# Altium PCB 24V-10A-Power-Board-v1.0.PcbDoc (part 5 of 5)
Units mil, origin at the board's own origin, x right, y up, seen from the top; angles counter-clockwise.
Board outline 6000 x 4000 mil, 2 copper layers (Top Layer, Bottom Layer); 609 components, 307 nets, 1491 pads, 0 vias.
Unrouted connection lines stored in the file: 1132.
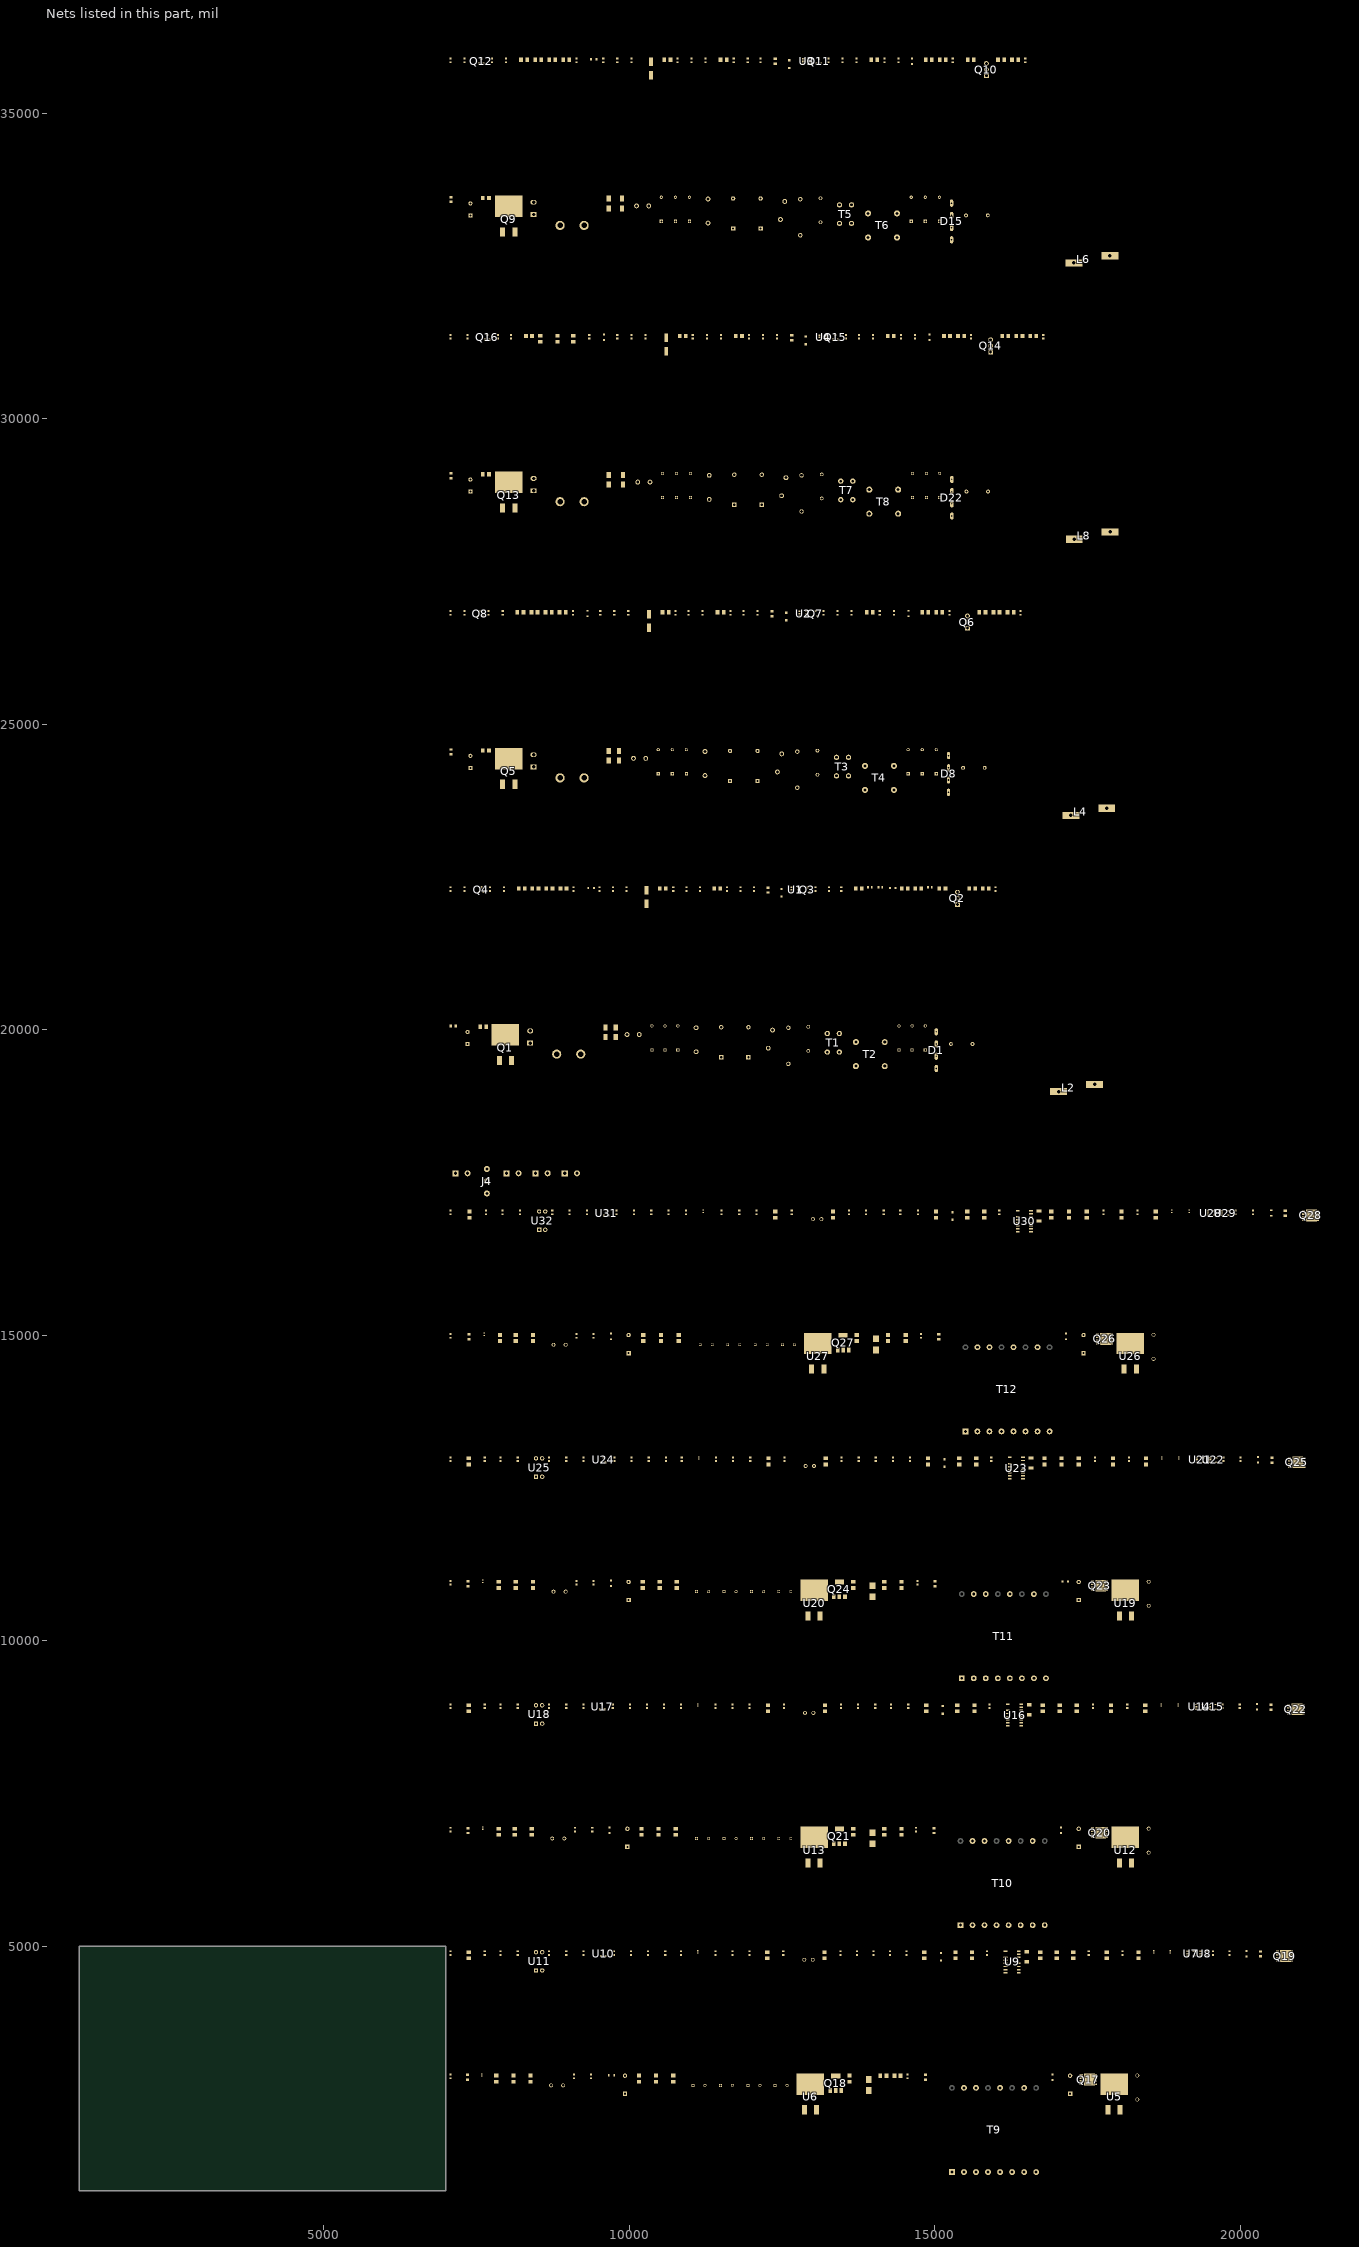
[diagram p2: the nets of this part, all layers, seen from the top]

## Nets (pads, with @x,y where several pads share a name; then routed paths per layer and width w, separated by ;. In a path a pad name is that pad's centre, name@x,y a point inside that pad or via, vN(x,y) a via of type N, cw(c..) or ccw(c..) an arc to the next point about the centre after c; other vN are vias at no path point) (continued)
24VDC-C2: C128.2 C130.1 C131.1 C132.1 C133.1 C134.1 C135.1 C136.2 C142.2 C143.2 C145.2 C147.2 J2.1 R162.2 T10.3 T10.4 T10.5 T10.6 U14.4 U15.4
24VDC-C3: C163.2 C165.1 C166.1 C167.1 C168.1 C169.1 C170.1 C171.2 C177.2 C178.2 C180.2 C182.2 J3.1 R192.2 T11.3 T11.4 T11.5 T11.6 U21.4 U22.4
24VDC-C4: C198.2 C200.1 C201.1 C202.1 C203.1 C204.1 C205.1 C206.2 C212.2 C213.2 C215.2 C217.2 J5.1 R222.2 T12.3 T12.4 T12.5 T12.6 U28.4 U29.4
AC_L: F1.1 F2.1 F3.1 F4.1 J4.1
AC_N: C1.2 C6.2 C24.2 C29.2 C47.2 C52.2 C70.2 C75.2 J4.3 T1.1 T3.1 T5.1 T7.1 VR1.2 VR2.2 VR3.2 VR4.2
BLK-C1: C125.2 R124.1 R128.2 U9.4
BLK-C2: C160.2 R154.1 R158.2 U16.4
BLK-C3: C195.2 R184.1 R188.2 U23.4
BLK-C4: C230.2 R214.1 R218.2 U30.4
BW-C1: C123.2 R108.1 R112.2 U9.8
BW-C2: C158.2 R138.1 R142.2 U16.8
BW-C3: C193.2 R168.1 R172.2 U23.8
BW-C4: C228.2 R198.1 R202.2 U30.8
DRV-C1: R5.1 R8.1 U1.5
DRV-C2: R31.1 R34.1 U2.5
DRV-C3: R83.1 R86.1 U4.5
DRV-C4: R57.1 R60.1 U3.5
EARTH: C1.1 C2.1 C3.1 C9.2 C10.2 C11.2 C24.1 C25.1 C26.1 C32.2 C33.2 C34.2 C47.1 C48.1 C49.1 C55.2 C56.2 C57.2 C70.1 C71.1 C72.1 C78.2 C79.2 C80.2 J4.2
FB-C1: C127.1 U9.5 U11.4
FB-C2: C162.1 U16.5 U18.4
FB-C3: C197.1 U23.5 U25.4
FB-C4: C232.1 U30.5 U32.4
GND: C4.1 C5.1 C13.1 C18.1 C20.1 C21.2 C22.1 C23.2 C27.1 C28.1 C36.1 C41.1 C43.1 C44.2 C45.1 C46.2 C50.1 C51.1 C59.1 C64.1 C66.1 C67.2 C68.1 C69.2 C73.1 C74.1 C82.1 C87.1 C89.1 C90.2 C91.1 C92.2 C93.1 C102.2 C105.2 C106.1 C114.1 C115.1 C116.1 C117.1 C118.2 C119.1 C120.2 C121.1 C122.1 C123.1 C124.1 C125.1 C127.2 C128.1 C137.2 C140.2 C141.1 C149.1 C150.1 C151.1 C152.1 C153.2 C154.1 C155.2 C156.1 C157.1 C158.1 C159.1 C160.1 C162.2 C163.1 C172.2 C175.2 C176.1 C184.1 C185.1 C186.1 C187.1 C188.2 C189.1 C190.2 C191.1 C192.1 C193.1 C194.1 C195.1 C197.2 C198.1 C207.2 C210.2 C211.1 C219.1 C220.1 C221.1 C222.1 C223.2 C224.1 C225.2 C226.1 C227.1 C228.1 C229.1 C230.1 C232.2 D1.4 D7.2 D8.4 D14.2 D15.4 D21.2 D22.4 D28.2 D32.2 D38.2 D44.2 D50.2 Q1.3 Q4.2 Q5.3 Q8.2 Q9.3 Q12.2 Q13.3 Q16.2 R2.1 R17.1 R18.1 R20.1 R21.2 R22.2 R23.1 R24.1 R26.1 R28.1 R43.1 R44.1 R46.1 R47.2 R48.2 R49.1 R50.1 R52.1 R54.1 R69.1 R70.1 R72.1 R73.2 R74.2 R75.1 R76.1 R78.1 R80.1 R95.1 R96.1 R98.1 R99.2 R100.2 R101.1 R102.1 R104.1 R111.2 R112.1 R125.1 R126.1 R128.1 R129.1 R141.2 R142.1 R155.1 R156.1 R158.1 R159.1 R171.2 R172.1 R185.1 R186.1 R188.1 R189.1 R201.2 R202.1 R215.1 R216.1 R218.1 R219.1 RT1.1 RT2.1 RT3.1 RT4.1 T9.14 T10.14 T11.14 T12.14 U1.4 U2.4 U3.4 U4.4 U6.3 U9.11 U13.3 U16.11 U20.3 U23.11 U27.3 U30.11
H_V-C1: C12.1 C94.1 D4.1 R1.2 R121.2 U5.2
H_V-C2: C35.1 C129.1 D11.1 R27.2 R151.2 U12.2
H_V-C3: C81.1 C164.1 D25.1 R79.2 R181.2 U19.2
H_V-C4: C58.1 C199.1 D18.1 R53.2 R211.2 U26.2
HB-C1: C113.1 D33.1 U9.14
HB-C2: C148.1 D39.1 U16.14
HB-C3: C183.1 D45.1 U23.14
HB-C4: C218.1 D51.1 U30.14
HO-C1: D29.1 R105.1 U9.15
HO-C2: D35.1 R135.1 U16.15
HO-C3: D41.1 R165.1 U23.15
HO-C4: D47.1 R195.1 U30.15
HS-C1: C113.2 R106.2 T9.12 U5.3 U6.2 U9.16
HS-C2: C148.2 R136.2 T10.12 U12.3 U13.2 U16.16
HS-C3: C183.2 R166.2 T11.12 U19.3 U20.2 U23.16
HS-C4: C218.2 R196.2 T12.12 U26.3 U27.2 U30.16
HV_S-C1: D2.1 D3.1 R117.1
HV_S-C2: D9.1 D10.1 R147.1
HV_S-C3: D23.1 D24.1 R177.1
HV_S-C4: D16.1 D17.1 R207.1
ISNS-C1: C103.1 C121.2 R125.2 U9.6
ISNS-C2: C138.1 C156.2 R155.2 U16.6
ISNS-C3: C173.1 C191.2 R185.2 U23.6
ISNS-C4: C208.1 C226.2 R215.2 U30.6
LO-C1: D31.1 R110.1 U9.10
LO-C2: D37.1 R140.1 U16.10
LO-C3: D43.1 R170.1 U23.10
LO-C4: D49.1 R200.1 U30.10
NetC2_2: C2.2 C7.2 T1.4 T2.1
NetC3_2: C3.2 C8.2 D1.2 D3.2 T2.4
NetC4_2: C4.2 D1.1 L1.1
NetC5_2: C5.2 L1.2 L2.1
NetC6_1: C6.1 C11.1 F1.2 T1.2 VR1.1
NetC7_1: C7.1 C9.1 T1.3 T2.2
NetC8_1: C8.1 C10.1 D1.3 D2.2 T2.3
NetC12_2: C12.2 Q1.2 RT1.2
NetC13_2: C13.2 Q1.1 Q3.3 R2.2
NetC14_1: C14.1 C15.2 C16.2 R10.1 R13.1 R15.2
NetC15_1: C15.1 C16.1 Q2.3 R9.2 R15.1 R21.1 R22.1 R23.2 R24.2
NetC17_1: C17.1 D7.1 R19.2
NetC18_2: C18.2 C19.2 U1.6
NetC19_1: C19.1 R20.2
NetC20_2: C20.2 R14.2 U1.3
NetC21_1: C21.1 D6.2 R14.1
NetC22_2: C22.2 R11.1 R12.1 R17.2 R18.2 U1.1
NetC25_2: C25.2 C30.2 T3.4 T4.1
NetC26_2: C26.2 C31.2 D8.2 D10.2 T4.4
NetC27_2: C27.2 D8.1 L3.1
NetC28_2: C28.2 L3.2 L4.1
NetC29_1: C29.1 C34.1 F2.2 T3.2 VR2.1
NetC30_1: C30.1 C32.1 T3.3 T4.2
NetC31_1: C31.1 C33.1 D8.3 D9.2 T4.3
NetC35_2: C35.2 Q5.2 RT2.2
NetC36_2: C36.2 Q5.1 Q7.3 R28.2
NetC37_1: C37.1 C38.2 C39.2 R36.1 R39.1 R41.2
NetC38_1: C38.1 C39.1 Q6.3 R35.2 R41.1 R47.1 R48.1 R49.2 R50.2
NetC40_1: C40.1 D14.1 R45.2
NetC41_2: C41.2 C42.2 U2.6
NetC42_1: C42.1 R46.2
NetC43_2: C43.2 R40.2 U2.3
NetC44_1: C44.1 D13.2 R40.1
NetC45_2: C45.2 R37.1 R38.1 R43.2 R44.2 U2.1
NetC48_2: C48.2 C53.2 T5.4 T6.1
NetC49_2: C49.2 C54.1 C54.2 C56.1 D15.2 D15.3 D16.2 D17.2 T6.3 T6.4
NetC50_2: C50.2 D15.1 L5.1
NetC51_2: C51.2 L5.2 L6.1
NetC52_1: C52.1 C57.1 F3.2 T5.2 VR3.1
NetC53_1: C53.1 C55.1 T5.3 T6.2
NetC58_2: C58.2 Q9.2 RT3.2
NetC59_2: C59.2 Q9.1 Q11.3 R54.2
NetC60_1: C60.1 C61.2 C62.2 R62.1 R65.1 R67.2
NetC61_1: C61.1 C62.1 Q10.3 R61.2 R67.1 R73.1 R74.1 R75.2 R76.2
NetC63_1: C63.1 D21.1 R71.2
NetC64_2: C64.2 C65.2 U3.6
NetC65_1: C65.1 R72.2
NetC66_2: C66.2 R66.2 U3.3
NetC67_1: C67.1 D20.2 R66.1
NetC68_2: C68.2 R63.1 R64.1 R69.2 R70.2 U3.1
NetC71_2: C71.2 C76.2 T7.4 T8.1
NetC72_2: C72.2 C77.2 D22.2 D24.2 T8.4
NetC73_2: C73.2 D22.1 L7.1
NetC74_2: C74.2 L7.2 L8.1
NetC75_1: C75.1 C80.1 F4.2 T7.2 VR4.1
NetC76_1: C76.1 C78.1 T7.3 T8.2
NetC77_1: C77.1 C79.1 D22.3 D23.2 T8.3
NetC81_2: C81.2 Q13.2 RT4.2
NetC82_2: C82.2 Q13.1 Q15.3 R80.2
NetC83_1: C83.1 C84.2 C85.2 R88.1 R91.1 R93.2
NetC84_1: C84.1 C85.1 Q14.3 R87.2 R93.1 R99.1 R100.1 R101.2 R102.2
NetC86_1: C86.1 D28.1 R97.2
NetC87_2: C87.2 C88.2 U4.6
NetC88_1: C88.1 R98.2
NetC89_2: C89.2 R92.2 U4.3
NetC90_1: C90.1 D27.2 R92.1
NetC91_2: C91.2 R89.1 R90.1 R95.2 R96.2 U4.1
NetC94_2: C94.2 C102.1 C103.2 C104.2 T9.10
NetC105_1: C105.1 C106.2 Q18.2 Q18.4 R107.1 R109.2
NetC109_2: C109.2 U7.3
NetC111_2: C111.2 U8.3
NetC118_1: C118.1 C120.1 D34.2 U9.3
NetC124_2: C124.2 R123.1 R126.2 U9.9
NetC126_1: C126.1 R133.2 U10.2 U11.2
NetC126_2: C126.2 R130.1
NetC129_2: C129.2 C137.1 C138.2 C139.2 T10.10
NetC140_1: C140.1 C141.2 Q21.2 Q21.4 R137.1 R139.2
NetC144_2: C144.2 U14.3
NetC146_2: C146.2 U15.3
NetC153_1: C153.1 C155.1 D40.2 U16.3
NetC159_2: C159.2 R153.1 R156.2 U16.9
NetC161_1: C161.1 R163.2 U17.2 U18.2
NetC161_2: C161.2 R160.1
NetC164_2: C164.2 C172.1 C173.2 C174.2 T11.10
NetC175_1: C175.1 C176.2 Q24.2 Q24.4 R167.1 R169.2
NetC179_2: C179.2 U21.3
NetC181_2: C181.2 U22.3
NetC188_1: C188.1 C190.1 D46.2 U23.3
NetC194_2: C194.2 R183.1 R186.2 U23.9
NetC196_1: C196.1 R193.2 U24.2 U25.2
NetC196_2: C196.2 R190.1
NetC199_2: C199.2 C207.1 C208.2 C209.2 T12.10
NetC210_1: C210.1 C211.2 Q27.2 Q27.4 R197.1 R199.2
NetC214_2: C214.2 U28.3
NetC216_2: C216.2 U29.3
NetC223_1: C223.1 C225.1 D52.2 U30.3
NetC229_2: C229.2 R213.1 R216.2 U30.9
NetC231_1: C231.1 R223.2 U31.2 U32.2
NetC231_2: C231.2 R220.1
NetD5_1: D5.1 R8.2
NetD5_2: D5.2 Q2.1 R5.2 R9.1
NetD12_1: D12.1 R34.2
NetD12_2: D12.2 Q6.1 R31.2 R35.1
NetD19_1: D19.1 R60.2
NetD19_2: D19.2 Q10.1 R57.2 R61.1
NetD26_1: D26.1 R86.2
NetD26_2: D26.2 Q14.1 R83.2 R87.1
NetD29_2: D29.2 R105.2 R106.1 U5.1
NetD30_1: D30.1 R108.2 T9.15
NetD30_2: D30.2 R107.2
NetD31_2: D31.2 R110.2 R111.1 U6.1
NetD32_1: D32.1 Q18.1 R109.1
NetD33_2: D33.2 R120.2
NetD35_2: D35.2 R135.2 R136.1 U12.1
NetD36_1: D36.1 R138.2 T10.15
NetD36_2: D36.2 R137.2
NetD37_2: D37.2 R140.2 R141.1 U13.1
NetD38_1: D38.1 Q21.1 R139.1
NetD39_2: D39.2 R150.2
NetD41_2: D41.2 R165.2 R166.1 U19.1
NetD42_1: D42.1 R168.2 T11.15
NetD42_2: D42.2 R167.2
NetD43_2: D43.2 R170.2 R171.1 U20.1
NetD44_1: D44.1 Q24.1 R169.1
NetD45_2: D45.2 R180.2
NetD47_2: D47.2 R195.2 R196.1 U26.1
NetD48_1: D48.1 R198.2 T12.15
NetD48_2: D48.2 R197.2
NetD49_2: D49.2 R200.2 R201.1 U27.1
NetD50_1: D50.1 Q27.1 R199.1
NetD51_2: D51.2 R210.2
NetQ3_1: Q3.1 Q4.3 R16.1
NetQ4_1: Q4.1 R19.1 R25.2 R26.2
NetQ7_1: Q7.1 Q8.3 R42.1
NetQ8_1: Q8.1 R45.1 R51.2 R52.2
NetQ11_1: Q11.1 Q12.3 R68.1
NetQ12_1: Q12.1 R71.1 R77.2 R78.2
NetQ15_1: Q15.1 Q16.3 R94.1
NetQ16_1: Q16.1 R97.1 R103.2 R104.2
NetR1_1: R1.1 R3.2
NetR3_1: R3.1 R6.2
NetR4_1: R4.1 R7.2
NetR6_1: R6.1 R11.2 R12.2
NetR7_1: R7.1 R10.2
NetR27_1: R27.1 R29.2
NetR29_1: R29.1 R32.2
NetR30_1: R30.1 R33.2
NetR32_1: R32.1 R37.2 R38.2
NetR33_1: R33.1 R36.2
NetR53_1: R53.1 R55.2
NetR55_1: R55.1 R58.2
NetR56_1: R56.1 R59.2
NetR58_1: R58.1 R63.2 R64.2
NetR59_1: R59.1 R62.2
NetR79_1: R79.1 R81.2
NetR81_1: R81.1 R84.2
NetR82_1: R82.1 R85.2
NetR84_1: R84.1 R89.2 R90.2
NetR85_1: R85.1 R88.2
NetR113_2: R113.2 U7.5
NetR114_2: R114.2 U8.5
NetR115_2: R115.2 U7.1
NetR116_2: R116.2 U8.1
NetR117_2: R117.2 R118.1
NetR118_2: R118.2 R119.1
NetR119_2: R119.2 U9.1
NetR121_1: R121.1 R122.2
NetR122_1: R122.1 R124.2
NetR127_1: R127.1 R130.2 R131.1 U10.1
NetR129_2: R129.2 U11.3
NetR131_2: R131.2 R132.1 R133.1 R134.2
NetR134_1: R134.1 U11.1
NetR143_2: R143.2 U14.5
NetR144_2: R144.2 U15.5
NetR145_2: R145.2 U14.1
NetR146_2: R146.2 U15.1
NetR147_2: R147.2 R148.1
NetR148_2: R148.2 R149.1
NetR149_2: R149.2 U16.1
NetR151_1: R151.1 R152.2
NetR152_1: R152.1 R154.2
NetR157_1: R157.1 R160.2 R161.1 U17.1
NetR159_2: R159.2 U18.3
NetR161_2: R161.2 R162.1 R163.1 R164.2
NetR164_1: R164.1 U18.1
NetR173_2: R173.2 U21.5
NetR174_2: R174.2 U22.5
NetR175_2: R175.2 U21.1
NetR176_2: R176.2 U22.1
NetR177_2: R177.2 R178.1
NetR178_2: R178.2 R179.1
NetR179_2: R179.2 U23.1
NetR181_1: R181.1 R182.2
NetR182_1: R182.1 R184.2
NetR187_1: R187.1 R190.2 R191.1 U24.1
NetR189_2: R189.2 U25.3
NetR191_2: R191.2 R192.1 R193.1 R194.2
NetR194_1: R194.1 U25.1
NetR203_2: R203.2 U28.5
NetR204_2: R204.2 U29.5
NetR205_2: R205.2 U28.1
NetR206_2: R206.2 U29.1
NetR207_2: R207.2 R208.1
NetR208_2: R208.2 R209.1
NetR209_2: R209.2 U30.1
NetR211_1: R211.1 R212.2
NetR212_1: R212.1 R214.2
NetR217_1: R217.1 R220.2 R221.1 U31.1
NetR219_2: R219.2 U32.3
NetR221_2: R221.2 R222.1 R223.1 R224.2
NetR224_1: R224.1 U32.1
PGND-C1: C101.1 J1.2 NT1.2 R127.2 U10.3
PGND-C2: C136.1 J2.2 NT2.2 R157.2 U17.3
PGND-C3: C171.1 J3.2 NT3.2 R187.2 U24.3
PGND-C4: C206.1 J5.2 NT4.2 R217.2 U31.3
RVCC-C1: C17.2 C114.2 C115.2 C116.2 C117.2 D6.1 Q3.2 R16.2 R120.1 R123.2 U9.12
RVCC-C2: C40.2 C149.2 C150.2 C151.2 C152.2 D13.1 Q7.2 R42.2 R150.1 R153.2 U16.12
RVCC-C3: C86.2 C184.2 C185.2 C186.2 C187.2 D27.1 Q15.2 R94.2 R180.1 R183.2 U23.12
RVCC-C4: C63.2 C219.2 C220.2 C221.2 C222.2 D20.1 Q11.2 R68.2 R210.1 R213.2 U30.12
SGND-C1: C95.2 C96.2 C97.2 C98.2 C99.2 C100.2 C107.1 C108.1 C109.1 C110.1 C111.1 C112.1 NT1.1 Q17.1 Q17.2 Q17.3 Q19.1 Q19.2 Q19.3 U7.2 U8.2
SGND-C2: C130.2 C131.2 C132.2 C133.2 C134.2 C135.2 C142.1 C143.1 C144.1 C145.1 C146.1 C147.1 NT2.1 Q20.1 Q20.2 Q20.3 Q22.1 Q22.2 Q22.3 U14.2 U15.2
SGND-C3: C165.2 C166.2 C167.2 C168.2 C169.2 C170.2 C177.1 C178.1 C179.1 C180.1 C181.1 C182.1 NT3.1 Q23.1 Q23.2 Q23.3 Q25.1 Q25.2 Q25.3 U21.2 U22.2
SGND-C4: C200.2 C201.2 C202.2 C203.2 C204.2 C205.2 C212.1 C213.1 C214.1 C215.1 C216.1 C217.1 NT4.1 Q26.1 Q26.2 Q26.3 Q28.1 Q28.2 Q28.3 U28.2 U29.2
VCC-C1: C119.2 D34.1 Q18.3 R25.1
VCC-C2: C154.2 D40.1 Q21.3 R51.1
VCC-C3: C189.2 D46.1 Q24.3 R103.1
VCC-C4: C224.2 D52.1 Q27.3 R77.1
VCR-C1: C104.1 C122.2 U9.7
VCR-C2: C139.1 C157.2 U16.7
VCR-C3: C174.1 C192.2 U23.7
VCR-C4: C209.1 C227.2 U30.7
VD-C1: C14.2 D4.2 L2.2 Q2.2 R4.2
VD-C2: C37.2 D11.2 L4.2 Q6.2 R30.2
VD-C3: C83.2 D25.2 L8.2 Q14.2 R82.2
VD-C4: C60.2 D18.2 L6.2 Q10.2 R56.2
VD_R1-C1: Q19.5 Q19.6 Q19.7 Q19.8 R113.1 T9.7 T9.8
VD_R1-C2: Q22.5 Q22.6 Q22.7 Q22.8 R143.1 T10.7 T10.8
VD_R1-C3: Q25.5 Q25.6 Q25.7 Q25.8 R173.1 T11.7 T11.8
VD_R1-C4: Q28.5 Q28.6 Q28.7 Q28.8 R203.1 T12.7 T12.8
VD_R2-C1: Q17.5 Q17.6 Q17.7 Q17.8 R114.1 T9.1 T9.2
VD_R2-C2: Q20.5 Q20.6 Q20.7 Q20.8 R144.1 T10.1 T10.2
VD_R2-C3: Q23.5 Q23.6 Q23.7 Q23.8 R174.1 T11.1 T11.2
VD_R2-C4: Q26.5 Q26.6 Q26.7 Q26.8 R204.1 T12.1 T12.2
VG_R1-C1: Q19.4 R115.1
VG_R1-C2: Q22.4 R145.1
VG_R1-C3: Q25.4 R175.1
VG_R1-C4: Q28.4 R205.1
VG_R2-C1: Q17.4 R116.1
VG_R2-C2: Q20.4 R146.1
VG_R2-C3: Q23.4 R176.1
VG_R2-C4: Q26.4 R206.1
ZCD/CS-C1: C23.1 R13.2 U1.2
ZCD/CS-C2: C46.1 R39.2 U2.2
ZCD/CS-C3: C92.1 R91.2 U4.2
ZCD/CS-C4: C69.1 R65.2 U3.2
pads on no net: L2.M1 L4.M1 L6.M1 L8.M1 T9.9 T9.11 T9.13 T9.16 T10.9 T10.11 T10.13 T10.16 T11.9 T11.11 T11.13 T11.16 T12.9 T12.11 T12.13 T12.16

## Text inside footprints (layer, text, board x,y; h text height)
D1: Top Overlay "-" at 15117.86,20000 h52.3 r270; Top Overlay "+" at 15129.29,19384 h52.3 r270
D8: Top Overlay "-" at 15317.86,24520 h52.3 r270; Top Overlay "+" at 15329.29,23904 h52.3 r270
D15: Top Overlay "-" at 15367.86,33560 h52.3 r270; Top Overlay "+" at 15379.29,32944 h52.3 r270
D22: Top Overlay "-" at 15372.86,29040 h52.3 r270; Top Overlay "+" at 15384.29,28424 h52.3 r270
T1: Top Overlay "1" at 13460,19558 h39.37 r90
T2: Top Overlay "1" at 14201,19321 h39.37 r90
T3: Top Overlay "1" at 13610,24078 h39.37 r90
T4: Top Overlay "1" at 14351,23841 h39.37 r90
T5: Top Overlay "1" at 13660,33118 h39.37 r90
T6: Top Overlay "1" at 14401,32881 h39.37 r90
T7: Top Overlay "1" at 13680,28598 h39.37 r90
T8: Top Overlay "1" at 14421,28361 h39.37 r90
T9: Top Overlay "16" at 15303.05,2772 h39.37 r90; Top Overlay "9" at 16681,2772 h39.37 r90; Top Overlay "8" at 16676,1211 h39.37 r90; Top Overlay "1" at 15288,1215 h39.37 r90; Top Overlay "Board Cutout" at 16239,1877 h60 r180
T10: Top Overlay "16" at 15443.05,6812 h39.37 r90; Top Overlay "9" at 16821,6812 h39.37 r90; Top Overlay "8" at 16816,5251 h39.37 r90; Top Overlay "1" at 15428,5255 h39.37 r90; Top Overlay "Board Cutout" at 16379,5917 h60 r180
T11: Top Overlay "16" at 15463.05,10852 h39.37 r90; Top Overlay "9" at 16841,10852 h39.37 r90; Top Overlay "8" at 16836,9291 h39.37 r90; Top Overlay "1" at 15448,9295 h39.37 r90; Top Overlay "Board Cutout" at 16399,9957 h60 r180
T12: Top Overlay "16" at 15523.05,14892 h39.37 r90; Top Overlay "9" at 16901,14892 h39.37 r90; Top Overlay "8" at 16896,13331 h39.37 r90; Top Overlay "1" at 15508,13335 h39.37 r90; Top Overlay "Board Cutout" at 16459,13997 h60 r180